# Altium PCB DIO_8SMA_8MCX.PcbDoc (part 8 of 9)
Units mm, origin at the board's own origin, x right, y up, seen from the top; angles counter-clockwise.
Board outline 222.9 x 100 mm, 6 copper layers (TopLayer, L2, L3, L4, L5, Bottom Layer), stack 1.492 mm thick; 542 components, 326 nets, 1968 pads, 1583 vias.
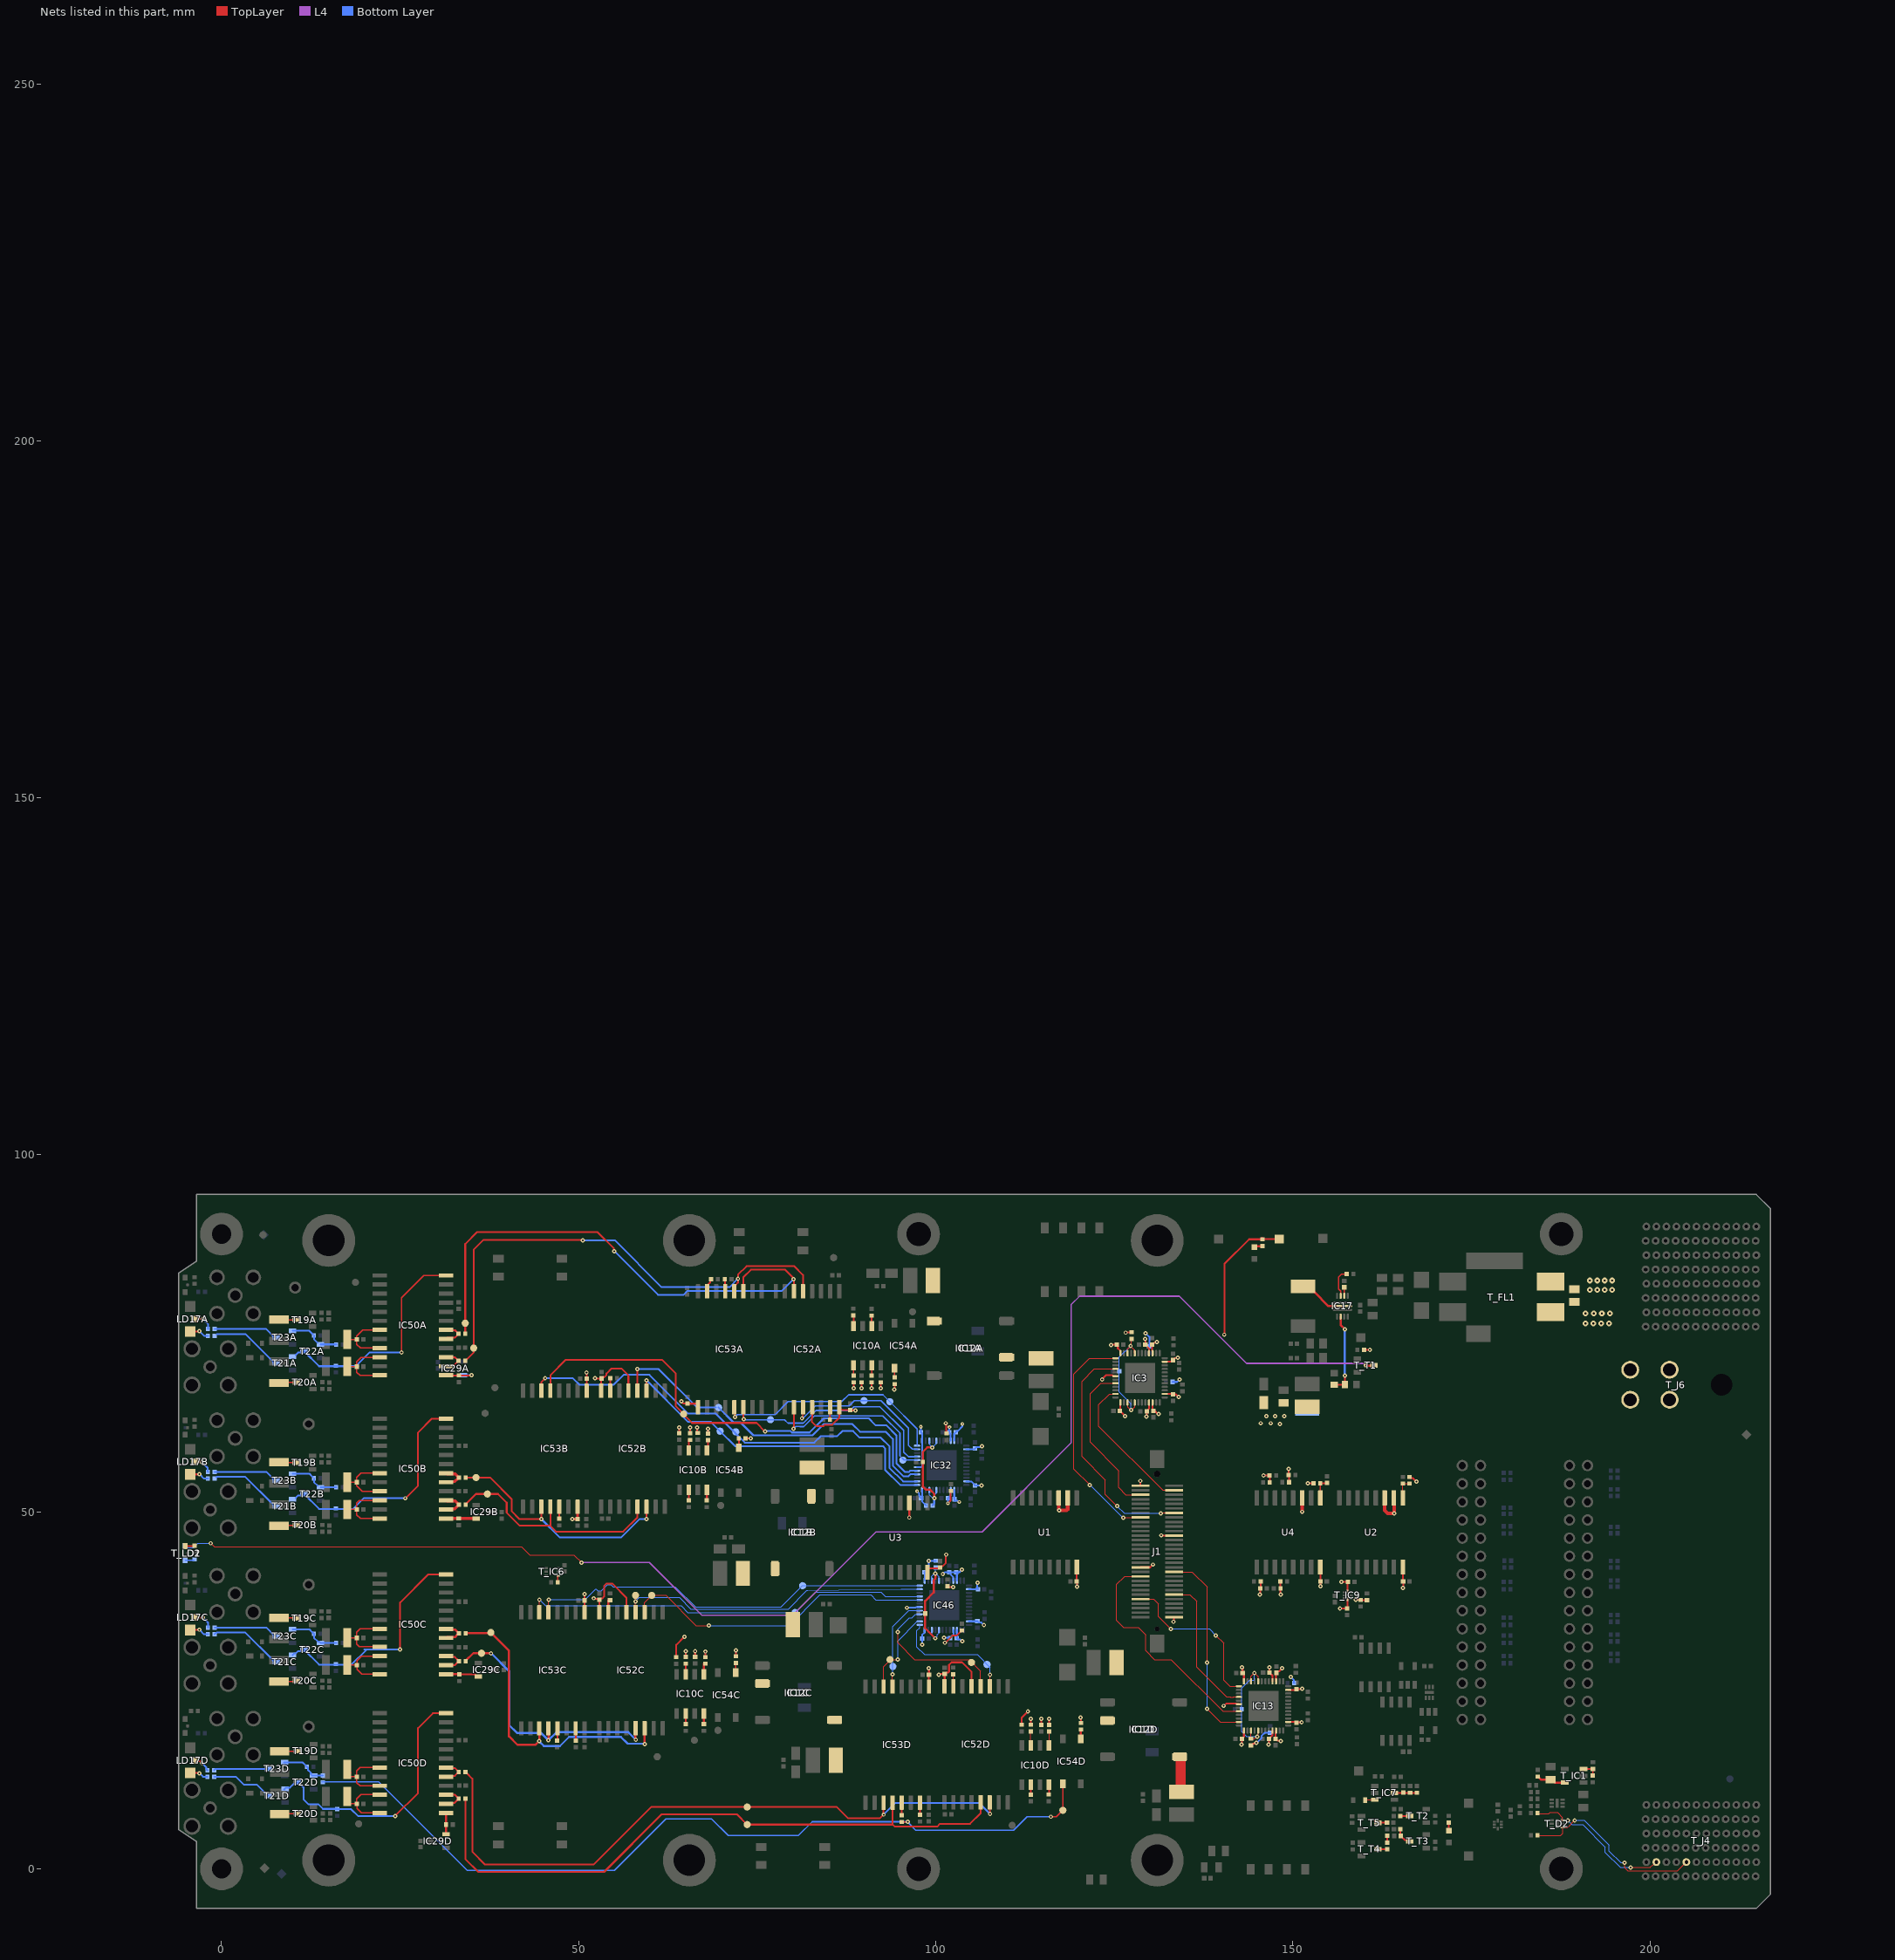
[diagram p11: the nets of this part, all layers, seen from the top]

## Via types
v1: diameter 0.6, hole 0.25, TopLayer to Bottom Layer, tented both sides, 1359 vias
v2: diameter 0.5, hole 0.2, TopLayer to Bottom Layer, tented both sides, 127 vias
v3: diameter 0.6, hole 0.3, TopLayer to Bottom Layer, tented both sides, 45 vias
v4: diameter 0.8, hole 0.3, TopLayer to Bottom Layer, tented both sides, 40 vias
v5: diameter 0.5, hole 0.25, TopLayer to Bottom Layer, tented both sides, 12 vias

## Nets (pads, with @x,y where several pads share a name; then routed paths per layer and width w, separated by ;. In a path a pad name is that pad's centre, name@x,y a point inside that pad or via, vN(x,y) a via of type N, cw(c..) or ccw(c..) an arc to the next point about the centre after c; other vN are vias at no path point) (continued)
LED_OUTD: B10D.1 IC54D.4 R216D.1 R222D.2 | length 120
  TopLayer w0.2: R216D.1@95.25,6.563 96.063,6.563 v1(96.1,6.6) ; v1(116.1,7.3) 116.9,7.3 B10D.1@117.8,8.2 ; B10D.1@117.78,8.2 IC54D.4@117.78,11.918
  Bottom Layer w0.2: R222D.2@14.046,12.2 22,12.2 34.4,-0.2 55,-0.2 62.2,7 68.6,7 70.946,4.654 80.754,4.654 82.7,6.6 v1(96.1,6.6) 96.1,6.492 97.192,5.4 110.909,5.4 ; 110.909,5.409 112.8,7.3 v1(116.1,7.3)
NetB4A_1: B4A.1 IC52A.5 IC53A.12 R204A.2 | length 71.9
  TopLayer w0.25: R204A.2@34.12,71.138 34.12,71.158 34.285,71.323 34.305,71.323 35.295,72.313 B4A.1@35.295,72.934 35.295,86.695 36.689,88.089 50.543,88.089 v1(50.594,88.039) ; IC53A.12@71.794,80.892 71.969,81.067 71.969,81.77 72.3,82.101 v1@72.3,82.5 ; v1(72.3,82.65) v1@72.3,82.5 ; IC52A.5@81.415,80.892 81.415,83.185 80.2,84.4 73.5,84.4 72.3,83.2 v1@72.3,82.5
  Bottom Layer w0.25: v1@50.603,88.039 55.061,88.039 61.629,81.471 71.121,81.471 v1(72.3,82.65)
NetB4B_1: B4B.1 IC52B.5 IC53B.12 R204B.2 | length 32.7
  TopLayer w0.25: R204B.2@34.17,51 34.335,51.165 34.335,51.224 35.611,52.5 B4B.1@37.218,52.5 38.7,52.5 39.924,51.276 39.924,49.876 41.715,48.085 46.033,48.085 ; IC53B.12@46.033,50.707 46.033,49.017 46.033,48.917 46.033,48.023 46.815,47.24 56.24,47.24 58.235,49.235 IC52B.5@58.235,50.708
NetB4C_1: B4C.1 IC52C.5 IC53C.12 R204C.2 | length 37.9
  TopLayer w0.3: R204C.2@34.17,29.1 34.17,29.12 35.25,30.2 B4C.1@36.4,30.2 37.693,30.2 v1(37.72,30.173) ; v1(45.757,18.006) 45.765,18.014 IC53C.12@45.765,19.675 ; IC52C.5@57.961,19.688 57.961,18.139 v1(58,18.1)
  Bottom Layer w0.3: v1(37.72,30.173) 37.777,30.173 40.272,27.677 40.272,20.128 41.355,19.045 44.719,19.045 v1(45.757,18.006) 46.886,19.134 56.966,19.134 v1(58,18.1)
NetB4D_1: B4D.1 IC52D.5 IC53D.12 R204D.2 | length 90.8
  TopLayer w0.25: R204D.2@34.155,9.834 34.155,1.345 34.229,1.271 35.927,-0.427 53.574,-0.427 61.63,7.629 72.171,7.629 B4D.1@73.6,6.2 93.965,6.2 ; IC53D.12@93.965,9.275 93.965,6.2 ; IC52D.5@106.285,9.308 106.285,7.785 104.8,6.3 100.6,6.3 100.2,5.9 94.265,5.9 93.965,6.2
NetB6A_1: B6A.1 IC52A.6 IC53A.11 R205A.2 | length 74.8
  TopLayer w0.25: R205A.2@34.12,74.938 B6A.1@34.12,76.416 34.12,87.52 35.8,89.2 52.6,89.2 54.933,86.867 54.933,86.567 v1(55,86.5) ; IC53A.11@73.06,81.396 73.06,82.837 74.123,83.9 78.918,83.9 79.932,82.886 79.932,82.863 80.1,82.695 v1(80.1,82.6) 80.145,82.555 IC52A.6@80.145,81.392
  Bottom Layer w0.25: v1(55,86.5) 61.1,80.4 63.752,80.4 63.771,80.381 64.222,80.381 64.241,80.4 64.7,80.4 65.245,80.945 78.445,80.945 v1(80.1,82.6)
NetB6B_1: B6B.1 IC52B.6 IC53B.11 R205B.2 | length 34.3
  TopLayer w0.25: R205B.2@34.17,54.8 B6B.1@35.632,54.8 37.6,54.8 40.6,51.8 40.6,50.1 41.713,48.987 v1(44.781,48.987) 44.763,49.005 IC53B.11@44.763,50.707 ; v1(59.497,48.968) IC52B.6@59.497,50.694
  Bottom Layer w0.25: v1(44.781,48.987) 47.368,46.4 55.943,46.4 58.512,48.968 v1(59.497,48.968)
NetB6C_1: B6C.1 IC52C.6 IC53C.11 R205C.2 | length 44
  TopLayer w0.3: R205C.2@34.261,33 37.8,33 40.238,30.562 40.238,18.562 41.447,17.353 43.915,17.353 44.495,17.933 IC53C.11@44.495,19.675 ; IC52C.6@59.231,19.688 59.231,17.95 59.237,17.944 v1(59.235,17.482) v1(59.235,17.482)
  Bottom Layer w0.3: v1(44.477,17.915) 44.477,17.856 45.133,17.2 47.373,17.2 48.653,18.48 55.915,18.48 56.865,17.53 59.188,17.53 v1(59.235,17.482)
NetB6D_1: B6D.1 IC52D.6 IC53D.11 R205D.2 | length 93.6
  TopLayer w0.25: R205D.2@34.152,13.583 34.152,13.563 34.317,13.398 34.337,13.398 35.1,12.636 35.1,2.4 36.9,0.6 52.091,0.6 60.143,8.653 B6D.1@73.6,8.653 86.147,8.653 87.7,7.1 92.2,7.1 v1(92.7,7.6) 92.688,7.612 IC53D.11@92.688,9.275 ; IC52D.6@107.555,9.308 107.555,7.745 v1(107.6,7.7)
  Bottom Layer w0.25: v1(92.7,7.6) 94.3,9.2 106.1,9.2 v1(107.6,7.7)
NetC1_1: C1.1 IC17.9 | length 1.2
  TopLayer w0.2: IC17.9@157.193,80.25 157.193,81.45 C1.1@157.196,81.454
NetIC1A_2: IC1A.2 IC12A.2 L11A.1
NetIC1A_5: IC1A.5 IC12A.5 L5A.2
NetIC1B_2: IC1B.2 IC12B.2 L11B.1
NetIC1B_5: IC1B.5 IC12B.5 L5B.2
NetIC1C_2: IC1C.2 IC12C.2 L11C.1
NetIC1C_5: IC1C.5 IC12C.5 L5C.2
NetIC1D_2: IC1D.2 IC12D.2 L11D.1
NetIC1D_5: IC1D.5 IC12D.5 L5D.2 | length 4.8
  TopLayer w1.4: IC1D.5@134.277,15.578 134.277,10.923 L5D.2@134.4,10.8
NetIC3_20: IC3.20 IC3.22 IC3.39 IC3.41 R5.1 R10.1 | length 16.4
  TopLayer w0.15: IC3.39@126.858,65.317 126.887,65.288 126.887,64.655 127.303,64.239 127.373,64.239 127.858,64.724 IC3.41@127.858,65.317 ; IC3.22@126.858,72.217 126.858,72.808 v1(127.273,73.222) ; R10.1@127.4,74.23 127.4,73.471 127.273,73.344 v1(127.273,73.222) ; IC3.20@127.858,72.217 127.83,72.245 127.83,72.67 127.278,73.222 v1(127.273,73.222)
  Bottom Layer w0.15: v1(127.273,73.222) 125.705,71.655 R5.1@125.705,69.669 125.707,69.667 125.707,66.793 127.352,65.148 v1(127.352,64.239)
NetIC10A_1: IC10A.1 R34A.1 | length 1.5
  TopLayer w0.2: IC10A.1@88.489,70.517 88.489,69.081 R34A.1@88.5,69.07
NetIC10A_3: IC10A.3 R29A.1 | length 1.5
  TopLayer w0.2: R29A.1@91,69.07 91.029,69.099 IC10A.3@91.029,70.517
NetIC10A_6: IC10A.6 R87A.2 | length 1.5
  TopLayer w0.25: R87A.2@91.017,77.477 91.029,77.465 IC10A.6@91.029,76.017
NetIC10A_8: IC10A.8 R88A.2 | length 1.5
  TopLayer w0.25: R88A.2@88.462,77.508 88.489,77.481 IC10A.8@88.489,76.017
NetIC10B_1: IC10B.1 R34B.1 | length 1.5
  TopLayer w0.25: IC10B.1@67.958,58.602 68.1,58.744 R34B.1@68.1,60.03
NetIC10B_3: IC10B.3 R29B.1 | length 1.5
  TopLayer w0.25: R29B.1@65.408,60.072 65.418,60.063 IC10B.3@65.418,58.602
NetIC10B_6: IC10B.6 R87B.2 | length 1.5
  TopLayer w0.25: IC10B.6@65.418,53.102 65.428,53.092 R87B.2@65.428,51.616
NetIC10B_8: IC10B.8 R88B.2 | length 1.5
  TopLayer w0.25: R88B.2@67.953,51.622 67.958,51.627 IC10B.8@67.958,53.102
NetIC10C_1: IC10C.1 R34C.1 | length 1.5
  TopLayer w0.25: R34C.1@67.526,28.743 67.531,28.738 IC10C.1@67.531,27.263
NetIC10C_3: IC10C.3 R29C.1 | length 1.5
  TopLayer w0.25: R29C.1@64.982,28.733 64.991,28.723 IC10C.3@64.991,27.263
NetIC10C_6: IC10C.6 R87C.2 | length 1.5
  TopLayer w0.25: IC10C.6@64.991,21.763 64.991,20.286 R87C.2@65.001,20.276
NetIC10C_8: IC10C.8 R88C.2 | length 1.5
  TopLayer w0.25: R88C.2@67.526,20.283 67.531,20.288 IC10C.8@67.531,21.763
NetIC10D_1: IC10D.1 R34D.1 | length 1.5
  TopLayer w0.15: IC10D.1@115.855,17.782 115.9,17.828 R34D.1@115.9,19.23
NetIC10D_3: IC10D.3 R29D.1 | length 1.5
  TopLayer w0.15: R29D.1@113.305,19.252 113.305,17.792 IC10D.3@113.315,17.782
NetIC10D_6: IC10D.6 R87D.2 | length 1.9
  TopLayer w0.25: R87D.2@113.315,10.396 IC10D.6@113.315,11.782 IC10D.6@113.315,12.282
NetIC10D_8: IC10D.8 R88D.2 | length 1.9
  TopLayer w0.25: R88D.2@115.855,10.406 IC10D.8@115.855,11.782 IC10D.8@115.855,12.282
NetIC13_20: IC13.20 IC13.22 IC13.39 IC13.41 R11.1 R26.1 | length 17.6
  TopLayer w0.15: IC13.39@144.146,19.365 144.146,18.238 R11.1@144.132,18.225 144.691,18.225 144.977,18.51 v1(145.004,18.51) 145.004,18.632 145.142,18.77 IC13.41@145.142,19.361 ; IC13.22@144.15,26.269 144.15,26.968 v1(144.619,27.437) 145.15,26.906 IC13.20@145.15,26.269
  Bottom Layer w0.15: v1(144.619,27.437) 144.619,26.533 144.531,26.445 143.945,26.445 142.844,25.345 142.844,23.322 142.85,23.317 R26.1@142.85,22.354 142.85,19.188 143.528,18.51 v1(145.004,18.51)
NetIC17_2: IC17.2 L10.1 | length 6.6
  TopLayer w0.3: L10.1@151.443,81.575 152.218,81.575 152.993,80.8 154.993,78.8 IC17.2@156.943,78.8
NetIC17_5: IC17.5 R51.1 R53.2 | length 11.3
  TopLayer w0.3: R51.1@155.8,67.8 157.261,67.8 R53.2@157.289,67.829 157.289,69.089 v1(157.3,69.1) ; IC17.5@156.693,77.35 156.693,76.176 157.273,75.596 v1(157.273,75.539)
  Bottom Layer w0.3: v1(157.273,75.539) 157.273,69.127 v1(157.3,69.1)
NetIC17_10: IC17.10 R68.1 | length 4.1
  TopLayer w0.2: IC17.10@156.693,80.25 156.693,80.9 156.397,81.196 156.397,82.887 156.81,83.3 R68.1@157.53,83.3
NetIC29A_2: IC29A.2 IC50A.13 R202A.2 | length 4.7
  TopLayer w0.25: IC50A.13@31.45,69.13 31.471,69.109 R202A.2@33.218,69.109 34.973,69.109 v1(34.99,69.125)
  Bottom Layer w0.25: IC29A.2@33.85,69.15 33.851,69.151 34.964,69.151 v1(34.99,69.125)
NetIC29B_2: IC29B.2 IC50B.13 R202B.2 | length 4.4
  TopLayer w0.4: IC50B.13@31.45,49.065 33.195,49.065 R202B.2@33.2,49.07 35.83,49.07 IC29B.2@35.85,49.05
NetIC29C_2: IC29C.2 IC50C.13 R202C.2 | length 4.6
  TopLayer w0.3: IC50C.13@31.45,27.265 33.275,27.265 R202C.2@33.3,27.24 35.435,27.24 IC29C.2@35.725,26.95 ; IC29C.2@36.025,26.95 IC29C.2@36.25,26.95
NetIC29D_2: IC29D.2 IC50D.13 R202D.2 | length 3
  TopLayer w0.3: IC50D.13@31.447,7.821 31.43,7.805 R202D.2@31.43,6.2 31.45,6.18 IC29D.2@31.45,4.85
NetIC32_20: IC32.20 IC32.22 IC32.39 IC32.41 R3.2 R61.1 | length 15.3
  TopLayer w0.3: v1(99.508,59.028) 99.488,59.008 98.808,59.008 98.192,58.392 R61.1@98.192,57.014 98.204,57.002 98.204,56.12 98.215,56.108 98.215,53.492 98.625,53.083 99.217,53.083 99.8,52.5 v1(99.8,51.9)
  Bottom Layer w0.15: IC32.22@99.093,53.058 99.093,52.387 99.493,51.986 99.714,51.986 v1(99.8,51.9) 99.8,52.022 99.888,52.11 99.888,52.426 100.064,52.602 100.064,53.03 IC32.20@100.093,53.058 ; IC32.39@99.093,59.958 99.101,59.95 99.101,59.436 v1(99.508,59.028) 100.018,59.538 100.018,59.543 100.093,59.618 IC32.41@100.093,59.958
  Bottom Layer w0.3: R3.2@99.57,50.9 99.57,50.92 99.8,51.15 v1(99.8,51.9)
NetIC32_25: B7B.1 IC32.25 IC52B.11 | length 47.2
  TopLayer w0.25: IC52B.11@59.502,66.956 IC52B.11@59.505,66.958 ; IC52B.11@59.507,66.96 v1@59.507,68.414
  Bottom Layer w0.25: v1(59.509,68.416) 65.339,62.586 68.514,62.586 B7B.1@69.8,61.3 71.9,59.2 92.6,59.2 92.9,58.9 92.9,55.894 95.036,53.758 IC32.25@97.393,53.758
NetIC32_26: B9B.1 IC32.26 IC53B.6 | length 64.3
  TopLayer w0.25: IC53B.6@44.763,66.957 44.785,66.979 44.785,68.185 v1(45.3,68.7)
  Bottom Layer w0.25: v1(45.3,68.7) 49.2,68.7 50.1,67.8 54.9,67.8 56.298,69.198 59.903,69.198 65.356,63.745 69.209,63.745 71.508,61.446 71.551,61.446 71.877,61.12 71.877,61.077 73.254,59.7 83,59.7 83.869,60.569 86.18,60.569 86.922,61.311 88.424,61.311 89.335,60.4 92.3,60.4 93.5,59.2 93.5,56.185 95.427,54.258 IC32.26@97.393,54.258
NetIC32_28: B5B.1 IC32.28 IC52B.12 | length 51.6
  TopLayer w0.25: IC52B.12@58.235,66.958 v1(58.235,70)
  Bottom Layer w0.25: v1(58.235,70) 61.2,70 66.6,64.6 B5B.1@69.207,64.6 ; B5B.1@69.6,64.6 71.655,62.545 72.626,62.545 74.461,60.71 82.75,60.71 84.34,62.3 88.3,62.3 89.39,61.21 91.79,61.21 91.8,61.2 93,61.2 93.984,60.216 93.984,56.471 95.467,54.988 96.188,54.988 96.458,55.258 IC32.28@97.393,55.258
NetIC32_29: B8B.1 IC32.29 IC53B.5 | length 67.7
  TopLayer w0.25: IC53B.5@46.033,66.957 46.033,69.133 48.2,71.3 61.677,71.3 63.6,69.377 63.6,64.8 B8B.1@64.7,63.7 64.7,63.637 65.882,62.455 74.9,62.455 v1(76.1,61.255)
  Bottom Layer w0.25: v1(76.1,61.255) 76.15,61.305 79.672,61.305 79.867,61.11 82.318,61.11 84.308,63.1 90.6,63.1 91.56,62.14 93.06,62.14 94.494,60.706 94.494,56.787 95.717,55.563 96.234,55.563 96.437,55.766 IC32.29@97.385,55.766
NetIC32_32: B7A.1 IC32.32 IC52A.11 | length 26
  TopLayer w0.2: v1(80.093,61.655) 80.145,61.707 IC52A.11@80.145,65.142
  Bottom Layer w0.2: v1(80.093,61.655) 80.113,61.655 80.41,61.952 80.998,61.952 81.007,61.943 81.51,61.943 83.011,63.445 92.587,63.445 94.984,61.049 94.984,57.846 95.571,57.258 IC32.32@97.393,57.258
NetIC32_33: B9A.1 IC32.33 IC53A.6 | length 32.3
  TopLayer w0.2: IC53A.6@73.064,65.142 73.064,63.036 v1(73.1,63)
  Bottom Layer w0.2: v1(73.1,63) 73.208,63 73.308,62.9 B9A.1@76.858,62.9 78.828,62.9 79.299,62.429 81.45,62.429 83.223,64.202 88.008,64.202 88.532,64.727 92.173,64.727 95.5,61.4 95.5,58.381 96.166,57.716 96.979,57.716 97.003,57.739 97.373,57.739 IC32.33@97.393,57.758
NetIC32_35: B5A.1 IC32.35 IC52A.12 | length 23.5
  TopLayer w0.2: v1(81.271,63.084) 81.271,63.192 81.408,63.329 81.408,65.134 IC52A.12@81.415,65.142
  Bottom Layer w0.2: v1(81.271,63.084) 81.377,63.084 83.134,64.841 87.856,64.841 88.587,65.572 92.328,65.572 96.185,61.715 96.185,59.315 96.716,58.784 96.997,58.784 97.003,58.778 97.373,58.778 IC32.35@97.393,58.758
NetIC32_36: B8A.1 IC32.36 IC53A.5 | length 33
  TopLayer w0.2: IC53A.5@71.794,65.142 71.847,65.089 71.847,63.353 v1(71.9,63.3)
  Bottom Layer w0.2: v1(71.9,63.3) 72.22,63.62 77.52,63.62 79.331,65.431 86.831,65.431 87.8,66.4 92.6,66.4 B8A.1@93.571,65.429 97.391,61.609 97.391,60.766 97.393,60.765 IC32.36@97.393,59.258
NetIC46_20: IC46.20 IC46.22 IC46.39 IC46.41 R9.2 R103.1 | length 16.4
  TopLayer w0.3: v1(99.923,32.285) 98.516,33.692 R103.1@98.516,35.761 98.516,37.522 99.716,38.722 99.716,40.414 99.948,40.646 v1(99.948,41.361)
  Bottom Layer w0.15: IC46.22@99.459,33.461 99.459,32.749 v1(99.923,32.285) 99.923,32.288 100.231,32.595 100.231,32.827 100.431,33.027 100.431,33.433 IC46.20@100.459,33.461 ; IC46.39@99.459,40.361 99.442,40.379 99.442,40.951 99.852,41.361 v1(99.948,41.361) ; R9.2@99.98,42.203 99.948,42.172 v1(99.948,41.361) ; IC46.41@100.459,40.361 100.459,40.918 100.016,41.361 v1(99.948,41.361)
NetIC46_25: B7D.1 IC46.25 IC52D.11 | length 17.4
  TopLayer w0.15: IC52D.11@107.555,25.558 107.6,25.604 v1(107.6,27.2)
  Bottom Layer w0.15: IC46.25@97.759,34.161 97.759,33.772 97.346,33.359 97.346,31.054 98.408,29.992 105.808,29.992 107.6,28.2 v1(107.6,27.2)
NetIC46_26: B9D.1 IC46.26 IC53D.6 | length 12
  TopLayer w0.15: IC53D.6@92.695,25.525 92.695,28.295 93.7,29.3 v1(94.7,29.3)
  Bottom Layer w0.15: v1(94.7,29.3) 94.7,31.937 97.425,34.661 IC46.26@97.759,34.661
NetIC46_28: B5D.1 IC46.28 IC52D.12 | length 21.2
  TopLayer w0.15: v1(94.69,33.146) 94.69,31.647 97.038,29.3 104.7,29.3 106.285,27.715 IC52D.12@106.285,25.558
  Bottom Layer w0.15: v1(94.69,33.146) 94.69,33.59 96.271,35.171 96.651,35.171 97.142,35.661 IC46.28@97.759,35.661
NetIC46_29: B8D.1 IC46.29 IC53D.5 | length 13.2
  TopLayer w0.15: v1(93.924,27.224) 93.9,27.2 93.9,25.59 IC53D.5@93.965,25.525
  Bottom Layer w0.15: v1(93.924,27.224) 94,27.3 94,33.919 96.241,36.161 96.954,36.161 ; 96.955,36.161 IC46.29@97.759,36.161
NetIC46_32: B7C.1 IC46.32 IC52C.11 | length 44.1
  TopLayer w0.15: IC52C.11@59.231,35.938 59.231,37.3 B7C.1@60.231,38.3 62.2,38.3 66.423,34.077 v1(68.21,34.077)
  Bottom Layer w0.15: v1(68.21,34.077) 79.477,34.077 83.768,38.368 90.896,38.368 91.603,37.661 IC46.32@97.759,37.661
NetIC46_33: B9C.1 IC46.33 IC53C.6 | length 57.2
  TopLayer w0.12: IC53C.6@44.495,35.925 44.495,37.695 v1(44.5,37.7)
  Bottom Layer w0.12: v1(44.5,37.7) 45.335,36.865 64.335,36.865 65.3,35.9 B9C.1@80.3,35.9 83.147,38.747 92.353,38.747 92.939,38.161 IC46.33@97.759,38.161
NetIC46_35: B5C.1 IC46.35 IC52C.12 | length 44.1
  TopLayer w0.15: IC52C.12@57.961,35.938 57.961,37.561 B5C.1@57.961,38.3
  Bottom Layer w0.15: v1(57.961,37.461) 58.501,38.001 64.099,38.001 65.696,36.404 79.404,36.404 81.975,38.975 82.018,39.018 82.079,39.019 95.113,39.161 IC46.35@97.759,39.161
NetIC46_36: B8C.1 IC46.36 IC53C.5 | length 57.4
  TopLayer w0.12: IC53C.5@45.765,35.925 45.765,37.665 v1(45.8,37.7)
  Bottom Layer w0.12: v1(45.8,37.7) 50.9,37.7 52.361,39.161 52.46,39.161 52.701,38.92 53.183,38.92 54.051,39.788 54.532,39.788 54.82,39.5 63.521,39.5 66.363,36.659 78.359,36.659 B8C.1@81.361,39.661 IC46.36@97.759,39.661
NetIC50A_7: IC50A.7 IC50A.9 R203A.2 R206A.2 | length 9.5
  TopLayer w0.175: R203A.2@17.6,74.15 17.605,74.145 R206A.2@18.93,74.145 ; IC50A.9@22.15,72.94 19.46,72.94 18.93,73.47 R206A.2@18.93,74.145 ; IC50A.7@22.15,75.48 19.78,75.48 18.93,74.63 R206A.2@18.93,74.145
NetIC50A_10: IC50A.10 IC50A.12 R208A.2 R210A.2 | length 9.7
  TopLayer w0.175: R208A.2@17.6,70.35 R210A.2@18.915,70.35 ; IC50A.12@22.15,69.13 22.12,69.1 19.4,69.1 18.93,69.57 R210A.2@18.93,70.335 ; IC50A.10@22.15,71.67 22.08,71.6 19.5,71.6 18.93,71.03 R210A.2@18.93,70.35 ; R210A.2@18.915,70.35 R210A.2@18.93,70.35 ; R210A.2@18.915,70.35 R210A.2@18.93,70.335 ; R210A.2@18.93,70.335 R210A.2@18.93,70.35
NetIC50A_14: IC50A.14 IC50A.15 R204A.1 | length 4
  TopLayer w0.25: IC50A.14@31.45,70.4 31.625,70.575 32.597,70.575 32.975,70.953 33.015,70.953 33.18,71.118 33.18,71.158 33.015,71.323 32.995,71.323 32.679,71.64 31.48,71.64 IC50A.15@31.45,71.67
NetIC50A_17: IC50A.17 IC50A.18 R205A.1 | length 4
  TopLayer w0.25: IC50A.17@31.45,74.21 31.614,74.374 32.616,74.374 32.995,74.753 33.015,74.753 33.18,74.918 R205A.1@33.18,74.938 33.18,74.958 33.015,75.123 32.995,75.123 32.679,75.44 31.49,75.44 IC50A.18@31.45,75.48
NetIC50A_24: IC50A.24 R220A.1 T21A.1 T22A.3 | length 32
  TopLayer w0.2: v1(25.2,72.3) 25.2,80 28.3,83.1 IC50A.24@31.45,83.1
  Bottom Layer w0.25: T21A.1@10.363,71.95 10.717,72.304 T22A.3@11.354,72.304 ; T22A.3@11.55,72.5 13.65,70.4 19.1,70.4 ; 18.8,70.4 20.7,72.3 v1(25.2,72.3)
NetIC50B_7: IC50B.7 IC50B.9 R203B.2 R206B.2 | length 9.6
  TopLayer w0.175: R203B.2@17.605,54.145 18.859,54.145 R206B.2@18.93,54.145 ; IC50B.9@22.15,52.875 19.69,52.875 18.891,53.675 18.891,54.106 R206B.2@18.93,54.145 ; IC50B.7@22.15,55.415 19.515,55.415 18.909,54.809 18.909,54.166 R206B.2@18.93,54.145
NetIC50B_10: IC50B.10 IC50B.12 R208B.2 R210B.2 | length 9.8
  TopLayer w0.175: R208B.2@17.6,50.35 18.915,50.35 R210B.2@18.926,50.339 ; R210B.2@18.926,50.331 18.926,49.57 19.43,49.065 IC50B.12@22.15,49.065 ; R210B.2@18.93,50.335 R210B.2@18.926,50.339 ; IC50B.10@22.15,51.605 19.301,51.605 18.926,51.23 R210B.2@18.926,50.339
NetIC50B_14: IC50B.14 IC50B.15 R204B.1 | length 4.1
  TopLayer w0.4: IC50B.14@31.45,50.335 31.55,50.435 32.665,50.435 33.12,50.89 33.14,50.89 33.23,50.98 R204B.1@33.23,51 33.23,51.02 33.14,51.11 33.12,51.11 32.712,51.518 31.537,51.518 IC50B.15@31.45,51.605
NetIC50B_17: IC50B.17 IC50B.18 R205B.1 | length 4.1
  TopLayer w0.4: IC50B.17@31.45,54.145 31.55,54.245 32.675,54.245 33.12,54.69 33.14,54.69 33.23,54.78 R205B.1@33.23,54.8 33.23,54.82 33.14,54.91 33.12,54.91 32.707,55.323 31.542,55.323 IC50B.18@31.45,55.415
NetIC50B_24: IC50B.24 R220B.1 T21B.1 T22B.3 | length 31.5
  TopLayer w0.25: v1(25.74,51.892) 25.753,51.892 27.5,53.639 27.5,61.1 29.435,63.035 IC50B.24@31.45,63.035
  Bottom Layer w0.25: T21B.1@10.363,51.95 10.717,52.304 T22B.3@11.354,52.304 ; T22B.3@11.55,52.5 13.65,50.4 16,50.4 18.4,50.4 19.892,51.892 v1(25.74,51.892)
NetIC50C_7: IC50C.7 IC50C.9 R203C.2 R206C.2 | length 9.8
  TopLayer w0.175: R203C.2@17.605,32.345 R206C.2@18.93,32.345 ; IC50C.9@22.15,31.075 22.125,31.1 19.3,31.1 18.93,31.47 R206C.2@18.93,32.345 ; IC50C.7@22.15,33.615 19.415,33.615 18.93,33.13 R206C.2@18.93,32.345
NetIC50C_10: IC50C.10 IC50C.12 R208C.2 R210C.2 | length 9.5
  TopLayer w0.175: R208C.2@17.6,28.55 R210C.2@18.945,28.55 ; R210C.2@18.949,28.55 R210C.2@18.945,28.55 ; IC50C.12@22.15,27.265 19.635,27.265 18.969,27.931 18.969,28.496 R210C.2@18.93,28.535 R210C.2@18.945,28.55 ; IC50C.10@22.15,29.805 19.593,29.805 18.948,29.16 18.948,28.553 R210C.2@18.945,28.55
NetIC50C_14: IC50C.14 IC50C.15 R204C.1 | length 4.1
  TopLayer w0.25: IC50C.14@31.45,28.535 31.463,28.549 32.679,28.549 33.045,28.915 33.065,28.915 33.23,29.08 R204C.1@33.23,29.1 33.23,29.12 33.065,29.285 33.045,29.285 32.652,29.678 31.578,29.678 IC50C.15@31.45,29.805
NetIC50C_17: IC50C.17 IC50C.18 R205C.1 | length 4.1
  TopLayer w0.3: IC50C.17@31.45,32.345 31.555,32.451 32.681,32.451 33.07,32.84 33.09,32.84 33.23,32.98 R205C.1@33.23,33 33.23,33.02 33.09,33.16 33.07,33.16 32.7,33.53 31.536,33.53 IC50C.18@31.45,33.615
NetIC50C_24: IC50C.24 R220C.1 T21C.1 T22C.3 | length 32.1
  TopLayer w0.25: v1(25,30.7) 25,37.3 28.935,41.235 IC50C.24@31.45,41.235
  Bottom Layer w0.25: T21C.1@9.95,29.95 10.15,30.15 10.363,30.15 10.717,30.504 11.354,30.504 T22C.3@11.55,30.7 13.65,28.6 16,28.6 18.2,28.6 20.3,30.7 ; 20,30.7 v1(25,30.7)
NetIC50D_7: IC50D.7 IC50D.9 R203D.2 R206D.2 | length 10.1
  TopLayer w0.175: R203D.2@17.6,13.95 17.6,13.887 R203D.2@18.087,13.4 ; R203D.2@18.087,12.9 R206D.2@18.93,12.9 ; IC50D.9@22.147,11.631 19.369,11.631 18.93,12.07 18.93,12.893 R206D.2@18.93,12.9 ; IC50D.7@22.147,14.171 19.371,14.171 18.93,13.73 R206D.2@18.93,12.9
NetIC50D_10: IC50D.10 IC50D.12 R208D.2 R210D.2 | length 9.7
  TopLayer w0.175: R208D.2@17.6,10.133 R208D.2@18.083,9.65 ; R208D.2@18.083,9.15 18.879,9.15 R210D.2@18.93,9.099 ; R210D.2@18.93,9.15 18.93,9.79 19.546,10.405 IC50D.10@22.15,10.405 ; R210D.2@18.961,9.099 18.961,8.48 19.575,7.865 IC50D.12@22.15,7.865
NetIC50D_14: IC50D.14 IC50D.15 R204D.1 | length 4.1
  TopLayer w0.25: IC50D.14@31.447,9.091 31.599,9.244 32.625,9.244 33.03,9.649 33.05,9.649 33.215,9.814 R204D.1@33.215,9.834 33.215,9.854 33.05,10.019 33.03,10.019 32.688,10.361 IC50D.15@31.447,10.361
NetIC50D_17: IC50D.17 IC50D.18 R205D.1 | length 4.1
  TopLayer w0.25: IC50D.17@31.447,12.901 31.57,13.025 32.654,13.025 33.027,13.398 33.047,13.398 33.212,13.563 R205D.1@33.212,13.583 33.212,13.603 33.047,13.768 33.027,13.768 32.675,14.12 31.498,14.12 IC50D.18@31.447,14.171
NetIC50D_24: IC50D.24 R220D.1 T21D.1 T22D.3 | length 37.4
  TopLayer w0.25: v1(24.3,7.4) 27.5,10.6 27.5,19.7 29.591,21.791 IC50D.24@31.447,21.791
  Bottom Layer w0.25: T21D.1@8.738,11.1 9.019,11.381 9.581,11.381 10.11,11.91 10.385,11.91 T22D.3@10.589,12.114 ; T22D.3@10.592,12.11 10.792,12.11 10.992,11.91 10.992,11.89 11.475,11.407 11.475,9.723 12.136,9.062 13.538,9.062 14.2,8.4 R220D.1@16.2,8.4 ; R220D.1@16.2,8.37 18.13,8.37 19.1,7.4 v1(24.3,7.4)
NetIC52A_15: IC52A.15 R209A.1 | length 1.9
  TopLayer w0.2: R209A.1@85.177,62.8 85.177,64.594 IC52A.15@85.225,64.642
NetIC52B_15: IC52B.15 R209B.1 | length 1.7
  TopLayer w0.25: R209B.1@54.408,68.657 54.425,68.64 IC52B.15@54.425,66.958
NetIC52C_15: IC52C.15 R209C.1 | length 1.7
  TopLayer w0.25: R209C.1@54.135,37.637 54.151,37.621 IC52C.15@54.151,35.938
NetIC52D_15: IC52D.15 R209D.1 | length 1.7
  TopLayer w0.15: R209D.1@102.458,27.257 102.458,25.574 IC52D.15@102.475,25.558
NetIC53A_13: IC53A.13 R216A.2 | length 1.2
  TopLayer w0.25: R216A.2@70.47,82.607 70.47,81.446 IC53A.13@70.524,81.392
NetIC53A_15: IC53A.15 R214A.2 | length 1.4
  TopLayer w0.25: IC53A.15@67.984,81.392 68.159,81.567 68.159,81.859 68.4,82.1 68.4,82.47 R214A.2@68.53,82.6
NetIC53B_13: IC53B.13 R216B.2 | length 1.7
  TopLayer w0.25: IC53B.13@47.303,50.707 R216B.2@47.304,49.04 R216B.2@47.304,49.04
NetIC53B_15: IC53B.15 R214B.2 | length 2.5
  TopLayer w0.4: v1(49.1,49) R214B.2@49.867,49.001 ; IC53B.15@49.843,50.707 49.843,49.027 R214B.2@49.868,49.002
NetIC53C_13: IC53C.13 R216C.2 | length 1.7
  TopLayer w0.25: R216C.2@47,17.97 47.035,18.005 IC53C.13@47.035,19.675
NetIC53C_15: IC53C.15 R214C.2 | length 1.7
  TopLayer w0.25: IC53C.15@49.575,19.675 49.6,19.65 R214C.2@49.6,17.97
NetIC53D_13: IC53D.13 R216D.2 | length 1.8
  TopLayer w0.25: IC53D.13@95.235,9.275 95.235,7.517 R216D.2@95.25,7.503
NetIC53D_15: IC53D.15 R214D.2 | length 1.7
  TopLayer w0.25: IC53D.15@97.775,9.275 97.775,7.595 R214D.2@97.8,7.57
NetIC54A_1: IC54A.1 R221A.1 | length 1.3
  TopLayer w0.2: IC54A.1@94.211,70.127 94.211,68.849 R221A.1@94.235,68.825
NetIC54B_1: IC54B.1 R221B.1 | length 1.3
  TopLayer w0.25: R221B.1@72.43,60.3 72.43,58.989 IC54B.1@72.439,58.98
NetIC54C_1: IC54C.1 R221C.1 | length 1.3
  TopLayer w0.2: R221C.1@72,28.83 72,27.489 IC54C.1@72.002,27.487
NetIC54D_1: IC54D.1 R221D.1 | length 1.3
  TopLayer w0.3: IC54D.1@120.32,18.218 120.333,18.231 R221D.1@120.333,19.501
NetLD17A_2: LD17A.2 R217A.2 | length 2.8
  TopLayer w0.25: LD17A.2@-3.75,77 v1(-2.6,77)
  Bottom Layer w0.25: v1(-2.6,77) -1.909,76.309 R217A.2@-1.909,75.595
NetLD17A_3: LD17A.3 R215A.2 | length 2.8
  TopLayer w0.25: LD17A.3@-4.4,75.25 -3.15,75.25 v1(-3.1,75.3)
  Bottom Layer w0.25: v1(-3.1,75.3) -2.454,74.654 R215A.2@-1.909,74.654
NetLD17B_2: LD17B.2 R217B.2 | length 2.7
  TopLayer w0.25: LD17B.2@-3.75,57 v1(-2.8,57)
  Bottom Layer w0.25: v1(-2.8,57) -1.934,56.134 -1.934,55.621 R217B.2@-1.909,55.595
NetLD17B_3: LD17B.3 R215B.2 | length 2.8
  TopLayer w0.25: LD17B.3@-4.4,55.25 -3.15,55.25 v1(-3.1,55.3)
  Bottom Layer w0.25: v1(-3.1,55.3) -2.454,54.654 R215B.2@-1.909,54.654
NetLD17C_2: LD17C.2 R217C.2 | length 2.8
  TopLayer w0.25: LD17C.2@-3.75,35.2 v1(-2.6,35.2)
  Bottom Layer w0.25: v1(-2.6,35.2) -1.909,34.509 R217C.2@-1.909,33.795
NetLD17C_3: LD17C.3 R215C.2 | length 2.8
  TopLayer w0.25: LD17C.3@-4.4,33.45 -3.15,33.45 v1(-3.1,33.5)
  Bottom Layer w0.25: v1(-3.1,33.5) -2.454,32.854 R215C.2@-1.909,32.854
NetLD17D_2: LD17D.2 R217D.2 | length 2.5
  TopLayer w0.25: LD17D.2@-3.75,15.2 -3.65,15.1 -3.056,15.1 -2.767,14.812 v1(-2.734,14.812)
  Bottom Layer w0.25: v1(-2.734,14.812) -2.135,14.212 -2.135,13.965 R217D.2@-1.97,13.8
NetLD17D_3: LD17D.3 R215D.2 | length 2.7
  TopLayer w0.25: LD17D.3@-4.4,13.45 -3.15,13.45 v1(-3.1,13.4)
  Bottom Layer w0.25: v1(-3.1,13.4) -2.6,12.9 R215D.2@-1.97,12.9
NetR55_2: R55.2 R56.2 U2.1 | length 2.9
  TopLayer w0.15: U2.1@165.413,51.95 165.413,53.946 R56.2@165.424,53.957 166.341,53.957 R55.2@166.344,53.954
NetR85_2: R85.2 R86.2 U4.1 | length 3
  TopLayer w0.2: R85.2@153.839,53.992 154.598,53.992 154.715,54.109 R86.2@154.715,54.115 ; U4.1@153.845,51.95 R85.2@153.845,53.992 ; R86.2@154.808,54.045 R86.2@154.845,54.008
NetR207A_1: R207A.1 T19A.3 | length 2.4
  TopLayer w0.175: R207A.1@8.033,76.95 8.084,76.9 T19A.3@10.45,76.9
NetR207B_1: R207B.1 T19B.3 | length 2.4
  TopLayer w0.175: R207B.1@8.033,56.95 8.083,56.9 T19B.3@10.45,56.9
NetR207C_1: R207C.1 T19C.3 | length 2.4
  TopLayer w0.175: R207C.1@8.033,35.15 10.4,35.15 T19C.3@10.45,35.1
NetR207D_1: R207D.1 T19D.3 | length 2.5
  TopLayer w0.175: R207D.1@8.133,16.45 10.6,16.45 T19D.3@10.65,16.5
NetR211A_1: R211A.1 T20A.3 | length 2.5
  TopLayer w0.175: R211A.1@8.033,68.05 8.138,68.156 T20A.3@10.478,68.156
NetR211B_1: R211B.1 T20B.3 | length 2.5
  TopLayer w0.175: R211B.1@8.033,48.05 8.096,48.114 10.446,48.114 T20B.3@10.483,48.15
NetR211C_1: R211C.1 T20C.3 | length 2.5
  TopLayer w0.175: R211C.1@8.033,26.25 10.383,26.25 T20C.3@10.483,26.35
NetR211D_1: R211D.1 T20D.3 | length 2.5
  TopLayer w0.175: R211D.1@8.133,7.65 8.233,7.75 T20D.3@10.583,7.75
NetR215A_1: R215A.1 T21A.3 | length 9.6
  Bottom Layer w0.25: R215A.1@-0.719,74.839 -0.657,74.9 3.32,74.9 T21A.3@7.22,71
NetR215B_1: R215B.1 T21B.3 | length 9.6
  Bottom Layer w0.25: R215B.1@-0.719,54.839 -0.657,54.9 3.32,54.9 T21B.3@7.22,51
NetR215C_1: R215C.1 T21C.3 | length 10.4
  Bottom Layer w0.25: R215C.1@-0.969,32.854 -0.969,32.874 -0.804,33.039 -0.719,33.039 -0.657,33.1 3.32,33.1 7.22,29.2 7.45,29.2 T21C.3@7.65,29
NetR215D_1: R215D.1 T21D.3 | length 8.8
  Bottom Layer w0.25: R215D.1@-1.03,12.9 2,12.9 3.1,11.8 4.9,11.8 6.183,10.517 6.183,10.45 6.383,10.25 T21D.3@6.583,10.25
NetR217A_1: R217A.1 T23A.3 | length 8.9
  Bottom Layer w0.25: R217A.1@-0.969,75.595 6.255,75.595 T23A.3@7.45,74.4
NetR217B_1: R217B.1 T23B.3 | length 8.9
  Bottom Layer w0.25: R217B.1@-0.969,55.595 6.255,55.595 T23B.3@7.45,54.4
NetR217C_1: R217C.1 T23C.3 | length 9.1
  Bottom Layer w0.25: R217C.1@-0.969,33.795 6.255,33.795 7.45,32.6 T23C.3@7.65,32.6
NetR217D_1: R217D.1 T23D.3 | length 7.7
  Bottom Layer w0.25: R217D.1@-1.03,13.8 -1.03,13.82 -0.865,13.985 -0.734,13.985 -0.719,14 T23D.3@6.55,14
NetR222A_1: R222A.1 R223A.2 T22A.1 T23A.1 | length 6.4
  Bottom Layer w0.25: T23A.1@9.95,75.35 12.28,75.35 R223A.2@12.745,74.885 ; R223A.2@12.939,74.691 12.939,74.161 T22A.1@13.45,73.65 ; T22A.1@13.85,73.45 R222A.1@16.037,73.45
NetR222B_1: R222B.1 R223B.2 T22B.1 T23B.1 | length 6.4
  Bottom Layer w0.25: T23B.1@9.95,55.35 12.28,55.35 R223B.2@12.745,54.885 ; R223B.2@12.939,54.691 12.939,54.161 T22B.1@13.45,53.65 ; T22B.1@13.85,53.45 R222B.1@16.037,53.45
NetR222C_1: R222C.1 R223C.2 T22C.1 T23C.1 | length 7.2
  Bottom Layer w0.25: T23C.1@9.95,33.55 12.28,33.55 12.745,33.085 12.765,33.085 12.93,32.92 R223C.2@12.93,32.9 12.939,32.891 12.939,32.361 13.45,31.85 13.65,31.85 T22C.1@13.85,31.65 R222C.1@16.037,31.65
NetR222D_1: R222D.1 R223D.2 T22D.1 T23D.1 | length 6.5
  Bottom Layer w0.25: T23D.1@8.719,14.9 11.33,14.9 11.745,14.485 11.765,14.485 11.93,14.32 R223D.2@11.93,14.3 12.095,14.135 12.095,13.857 12.492,13.46 12.492,13.26 12.692,13.06 T22D.1@12.892,13.06 R222D.1@14.19,13.06
NetT_C2_2: T_C2.2 T_IC1.5 T_R2.1 | length 4.2
  TopLayer w0.3: T_R2.1@184.3,12.93 184.32,12.93 184.46,12.79 184.46,12.77 184.73,12.5 T_C2.2@186.1,12.5 186.275,12.5 186.693,12.082 T_IC1.5@188.098,12.082
NetT_C11_1: T_C11.1 T_FL1.3 T_J6.1 T_J6.2
  other v4: 191.6,81.1 192.633,81.1 193.667,81.1 194.7,81.1 191.6,82.4 192.633,82.4 193.667,82.4 194.7,82.4
NetT_C11_2: T_C11.2 T_FL1.1 T_J6.3 T_J6.4
  other v4: 191,76.4 192.1,76.4 193.2,76.4 194.3,76.4 191,77.8 192.133,77.8 193.267,77.8 194.4,77.8
NetT_C13_1: T_C13.1 T_IC7.5 T_R29.2 T_R30.2 | length 3.2
  TopLayer w0.25: T_IC7.5@164.2,10.633 167.327,10.633 T_R29.2@167.357,10.662
NetT_C14_1: T_C14.1 T_C21.2 | length 1
  TopLayer w0.25: T_C21.2@163.2,3.65 T_C14.1@163.2,4.65
NetT_C15_1: T_C15.1 T_T5.3 | length 1.3
  TopLayer w0.25: T_T5.3@161.918,6.45 163.154,6.45 T_C15.1@163.184,6.48
NetT_C17_1: T_C17.1 T_T2.3 | length 1.3
  TopLayer w0.25: T_C17.1@165.05,7.4 166.34,7.4 T_T2.3@166.368,7.428
NetT_C18_1: T_C18.1 T_C19.1 T_T3.3 | length 2.5
  TopLayer w0.25: T_C19.1@165.072,4.507 T_C18.1@165.072,5.425 ; T_C19.1@165.09,4.613 165.677,4.026 166.207,4.026 T_T3.3@166.382,3.85
NetT_C21_1: T_C21.1 T_T4.3 | length 1.3
  TopLayer w0.25: T_T4.3@161.918,2.75 T_C21.1@163.2,2.75
NetT_D2_4: T_D2.4 T_J4.H2 T_R15.2 | length 26.6
  TopLayer w0.15: T_R15.2@184.27,4.7 187.5,4.7 187.8,5 187.8,5.76 T_D2.4@187.76,5.8 188.456,5.8 v1(189.456,6.8) ; v1(196.451,0.863) 196.451,0.151 196.896,-0.295 203.855,-0.295 T_J4.H2@205.1,0.95 T_J4.H2@205.103,0.95
  Bottom Layer w0.15: v1(189.456,6.8) 190.8,6.8 194.3,3.3 194.3,2.5 195.937,0.863 v1(196.451,0.863)
NetT_D2_6: T_D2.6 T_J4.K2 T_R17.2 | length 20.8
  TopLayer w0.12: T_R17.2@184.27,7.8 184.352,7.718 185.839,7.718 186.001,7.88 187.04,7.88 187.76,7.16 T_D2.6@187.76,6.8 v1(188.5,6.8) ; v1(197.3,0.2) 197.32,0.22 200.026,0.22 200.07,0.22 200.103,0.248 200.716,0.762 200.902,0.948 T_J4.K2@200.903,0.95
  Bottom Layer w0.12: v1(188.5,6.8) 189.1,6.2 190.6,6.2 193.757,3.043 193.757,2.312 195.869,0.2 v1(197.3,0.2)
NetT_D6_2: T_D6.2 T_IC7.3 | length 1.4
  TopLayer w0.15: T_D6.2@160.136,9.624 160.195,9.683 T_IC7.3@161.5,9.683
NetT_IC1_3: T_IC1.3 T_R4.2 T_R7.2 | length 2.3
  TopLayer w0.2: T_IC1.3@190.698,13.982 190.709,13.993 T_R7.2@192.018,13.993 192,13.976 T_R4.2@192,13.07
NetT_IC6_4: T_IC6.4 T_R25.2 | length 1
  TopLayer w0.2: T_R25.2@47.079,40.119 47.079,41.05 47.129,41.1 T_IC6.4@47.138,41.1
NetT_LD1_2: T_LD1.2 T_R1.1 | length 1.3
  TopLayer w0.2: T_LD1.2@-5.1,45.2 -3.87,45.2 T_R1.1@-3.8,45.27
NetT_LD2_1: T_LD2.1 T_T1.3 | length 204.7
  TopLayer w0.15: v1(-1.5,45.6) -1,45.1 42,45.1 43.143,43.957 49.343,43.957 v1(50.4,42.9)
  TopLayer w0.3: v2(160.177,70.521) 160.213,70.485 T_T1.3@161.335,70.485
  L4 w0.2: v1(50.4,42.9) 59.898,42.9 67.298,35.5 79.935,35.5 91.635,47.2 106.5,47.2 118.98,59.68 118.98,79.033 120.147,80.2 134.1,80.2 143.506,70.794 159.905,70.794 v2(160.177,70.521)
  Bottom Layer w0.15: T_LD2.1@-5.1,45.005 -3.895,45.005 -3.3,45.6 v1(-1.5,45.6)
NetT_LD2_2: T_LD2.2 T_R3.2 | length 1.3
  Bottom Layer w0.2: T_LD2.2@-5.1,43.2 -3.853,43.2 T_R3.2@-3.848,43.195
NetT_LD3_2: T_LD3.2 T_R5.1 | length 1.3
  TopLayer w0.3: T_LD3.2@144.6,87.1 144.7,87.2 T_R5.1@145.85,87.2
NetT_LD4_2: T_LD4.2 T_R6.1 | length 1.1
  TopLayer w0.2: T_R6.1@171.833,6.48 171.833,5.349 T_LD4.2@171.844,5.337
OUT_CH9: IC3.35 J1.4 | length 20.2
  TopLayer w0.15: IC3.35@125.158,66.517 124.317,66.517 122.826,65.026 122.826,61.974 131.778,53.023 J1.4@133.35,53.023
OUT_CH10: IC3.32 J1.5 | length 22.4
  TopLayer w0.15: IC3.32@125.13,68.045 123.146,68.045 121.621,66.52 121.621,59.743 125.6,55.764 125.6,53.4 126.613,52.388 J1.5@128.65,52.388
OUT_CH11: IC3.28 J1.14 | length 33.3
  TopLayer w0.12: v1(131.5,49.8) 131.548,49.848 J1.14@133.35,49.848
  TopLayer w0.15: IC3.28@125.158,70.017 122.2,70.017 120.459,68.276 120.459,57.741 123.754,54.446 123.754,52.446 v1(125.4,50.8)
  Bottom Layer w0.12: v1(125.4,50.8) 126.4,49.8 v1(131.5,49.8)
OUT_CH12: IC3.25 J1.15 | length 32.2
  TopLayer w0.15: v1(121.558,53.754) 119.3,56.012 119.3,69.3 121.5,71.5 IC3.25@125.142,71.5 ; v1(126.244,49.175) 126.282,49.213 J1.15@128.65,49.213
  Bottom Layer w0.15: v1(121.558,53.754) 121.57,53.754 126.148,49.175 v1(126.244,49.175)
OUT_CH13: IC13.35 J1.40 | length 27.8
  TopLayer w0.12: J1.40@133.35,41.593 135.908,41.593 138,39.5 v1(138,28.9) ; v1(138,22.4) 138.038,22.4 139.869,20.569 IC13.35@142.45,20.569
  Bottom Layer w0.12: v1(138,22.4) v1(138,28.9)
OUT_CH14: IC13.32 J1.41 | length 32.5
  TopLayer w0.12: J1.41@128.65,40.958 126.457,40.958 125.331,39.831 125.331,34.769 126.276,33.824 128.376,33.824 129.401,32.799 129.401,30.549 130.65,29.3 132.959,29.3 140.19,22.069 IC13.32@142.45,22.069
OUT_CH15: IC13.28 J1.50 | length 20.4
  TopLayer w0.12: J1.50@133.35,38.418 133.368,38.4 135.6,38.4 136.548,37.452 136.548,28.24 140.718,24.069 141.268,24.069 141.278,24.059 141.676,24.059 141.686,24.069 IC13.28@142.45,24.069
OUT_CH16: IC13.25 J1.51 | length 22.9
  TopLayer w0.127: J1.51@128.65,37.783 130.485,37.783 131.179,37.088 131.179,35.321 v1(132.9,33.6) ; v1(139.2,32.7) 140.319,31.581 140.319,26.419 141.169,25.569 IC13.25@142.45,25.569
  Bottom Layer w0.127: v1(132.9,33.6) 138.3,33.6 v1(139.2,32.7)
P3V3: C2.2 C3.2 C15.2 C16.2 C17.2 C18.2 C19.2 C20.2 C21.2 C22.2 C23.2 C24.2 C25.2 C26.2 C27.2 C54.2 C55.2 C64.2 C65.2 C75.2 C77A.2 C77B.2 C77C.2 C77D.2 C78A.2 C78B.2 C78C.2 C78D.2 C84.2 C85.1 C92.2 C96.2 C97.2 C106.2 C107.2 C108.2 C109.2 C110.2 C111.2 C112.2 C113.2 C114.2 C115.2 C116.2 C117.2 C118.2 IC3.2 IC3.11 IC3.15 IC3.16 IC3.24 IC3.30 IC3.37 IC3.45 IC3.46 IC13.2 IC13.11 IC13.15 IC13.16 IC13.24 IC13.30 IC13.37 IC13.45 IC13.46 IC32.2 IC32.11 IC32.15 IC32.16 IC32.24 IC32.30 IC32.37 IC32.45 IC32.46 IC46.2 IC46.11 IC46.15 IC46.16 IC46.24 IC46.30 IC46.37 IC46.45 IC46.46 IC52A.13 IC52A.16 IC52B.13 IC52B.16 IC52C.13 IC52C.16 IC52D.13 IC52D.16 IC53A.1 IC53B.1 IC53C.1 IC53D.1 J1.1 J1.24 J1.37 J1.60 L9.2 R1.2 R2.2 R3.1 R4.2 R7.2 R8.2 R9.1 R10.2 R11.2 R17.2 R18.2 R19.2 R20.2 R21.2 R22.2 R23.2 R24.2 R25.2 R29A.2 R29B.2 R29C.2 R29D.2 R34A.2 R34B.2 R34C.2 R34D.2 R55.1 R58.2 R59.2 R60.2 R85.1 R89.2 R90.2 R91.2 R92.2 R93.2 R94.2 R95.2 R96.2 R101.2 R221A.2 R221B.2 R221C.2 R221D.2 T_C25.2 T_IC9.1 T_IC9.5 T_R5.2 T_R67.2 T_R68.2 T_R69.2 T_TP2.1 U1.2 U1.3 U1.16 U2.2 U2.3 U2.16 U3.3 U3.16 U4.3 U4.16 | length 239.9
  TopLayer w0.25: v1(50.8,38.5) 50.85,38.45 C78C.2@50.85,37.6 50.845,37.595 IC53C.1@50.845,35.925 ; v1(51.1,69.5) 51.118,69.482 C78B.2@51.118,68.632 51.113,68.627 IC53B.1@51.113,66.957 ; v1(52.1,37.896) 52.195,37.896 52.282,37.809 52.78,37.809 C77C.2@52.926,37.663 ; v1(52.3,68.7) 52.317,68.683 C77B.2@53.2,68.683 ; IC52C.16@52.881,35.938 52.881,37.618 C77C.2@52.926,37.663 ; IC52B.16@53.155,66.958 53.155,68.638 C77B.2@53.2,68.683 ; IC52C.13@56.691,35.938 56.691,37.986 54.742,39.935 53.864,39.935 53.561,39.632 53.561,38.127 53.282,37.848 53.111,37.848 C77C.2@52.926,37.663 ; IC52B.13@56.965,66.958 56.965,69.11 55.999,70.076 54.609,70.076 53.892,69.358 53.892,69.171 53.589,68.868 53.385,68.868 C77B.2@53.2,68.683 ; R21.2@63.676,29.65 63.673,29.653 63.673,31.373 v1(64.8,32.5) ; v1(64.067,61.794) 64.098,61.763 R19.2@64.098,61.031 ; v1(64.385,65.486) 64.385,65.436 64.674,65.148 65.21,65.148 C78A.2@65.24,65.178 65.274,65.144 IC53A.1@66.712,65.144 ; R29C.2@64.982,29.673 v1(64.982,30.482) ; v1(65.593,61.797) 65.601,61.788 R29B.2@65.601,61.009 ; R22.2@66.309,29.696 v1(66.309,30.491) ; v1(66.59,61.818) v1@66.59,61.697 ; R20.2@66.677,61.044 66.59,61.13 v1@66.59,61.697 ; v1@66.677,61.61 v1@66.59,61.697 ; R34C.2@67.768,29.682 v1(67.768,30.445) ; R34B.2@68.1,60.97 v1(68.1,61.655) ; R221C.2@72,29.77 v1(72,30.6) ; R221B.2@73.37,60.3 v1(74.1,60.3) ; IC52A.13@82.685,64.642 82.685,63.155 82.633,63.102 82.633,62.651 83.298,61.986 84.231,61.986 84.445,62.2 85.5,62.2 86.495,63.195 IC52A.16@86.495,64.642 ; IC52A.16@86.65,64.25 IC52A.16@86.65,64.487 ; IC52A.16@86.65,64.27 86.67,64.25 C77A.2@88,64.25 88.022,64.228 88.726,64.228 v1(88.748,64.207) ; v1(88.5,67.3) R34A.2@88.5,68.13 ; v1(89.6,67.3) R18.2@89.6,68.13 ; v1(91,67.3) R29A.2@91,68.13 ; v1(92.3,67.3) R17.2@92.3,68.13 ; v1(94.213,67.117) 94.235,67.139 R221A.2@94.235,67.885 ; v1(96.3,49.2) U3.3@96.3,51.245 ; U3.16@98.845,41.55 98.845,41.881 99.045,42.081 100.513,42.081 C54.2@100.625,42.193 100.81,42.378 100.93,42.378 101.42,42.868 101.42,43.982 v1(101.447,44.009) ; v1(99,28.1) 99.05,28.05 C78D.2@99.05,27.2 99.045,27.195 IC53D.1@99.045,25.525 ; v1(100.4,27.2) 100.483,27.283 C77D.2@101.25,27.283 ; IC52D.16@101.205,25.558 101.25,25.603 C77D.2@101.25,27.283 ; v1(101.264,31.672) 101.356,31.672 102.346,32.661 102.916,32.661 R60.2@103.646,33.391 ; v1(101.4,62.4) 101.448,62.352 101.448,61.039 R59.2@101.508,60.978 ; R101.2@101.661,39.581 101.78,39.461 v1(102.446,39.461) ; v2(101.708,51.208) 102.093,51.593 R58.2@102.093,52.923 ; IC52D.13@105.015,25.558 105.015,27.585 103.679,28.921 102.201,28.921 101.857,28.577 101.857,27.614 101.71,27.468 101.435,27.468 C77D.2@101.25,27.283 ; R23.2@112.051,20.174 112.051,21.194 v1(112.911,22.054) ; v1(113.3,21) 113.305,20.995 R29D.2@113.305,20.192 ; R24.2@114.8,20.17 v1(114.8,21) ; R34D.2@115.9,20.17 v1(115.9,21) ; U1.16@119.745,42.25 119.745,40.256 C75.2@119.746,40.255 119.762,40.239 119.762,39.529 v1(119.777,39.514) ; v1(120.3,21.2) 120.333,21.167 R221D.2@120.333,20.441 ; v1(123.3,68.543) 123.3,68.601 123.84,69.141 124.72,69.141 124.845,69.017 IC3.30@125.158,69.017 ; v1(124.569,73.385) 124.585,73.4 C107.2@125.35,73.4 125.5,73.25 125.5,72.9 125.849,72.551 125.849,72.226 IC3.24@125.858,72.217 ; IC3.37@125.858,65.317 125.858,64.212 C108.2@125.788,64.142 126.506,63.424 v1(126.509,63.424) ; v1(126.6,75.1) 126.635,75.135 127.365,75.135 R10.2@127.4,75.17 ; J1.37@128.65,42.228 128.66,42.237 130.037,42.237 130.4,42.6 v1(130.4,42.609) ; J1.1@128.65,53.658 128.65,54.33 v1(128.653,54.333) ; v1(129.3,74.2) 129.35,74.15 C106.2@129.35,73.4 129.858,72.892 IC3.16@129.858,72.217 ; v1(129.517,63.337) 129.55,63.37 C109.2@129.55,64.1 129.735,64.285 129.735,64.318 129.849,64.431 129.849,65.307 IC3.45@129.858,65.317 ; IC3.46@130.358,65.317 130.358,64.292 C110.2@130.5,64.15 130.519,64.169 130.659,64.169 131.13,63.698 v1(131.222,63.698) ; IC3.15@130.358,72.217 130.358,72.557 130.287,72.628 C92.2@130.287,73.419 130.522,73.654 130.705,73.654 130.821,73.77 v1(130.943,73.77) ; v1(131.6,46.7) 131.628,46.673 J1.24@133.35,46.673 ; IC3.2@132.058,66.517 133.133,66.517 C64.2@133.2,66.45 133.65,66.45 v1(134,66.1) ; IC3.11@132.058,71.017 132.967,71.017 C65.2@133.2,71.25 133.485,71.535 133.835,71.535 v1(133.9,71.6) ; v1(133.3,34.6) 133.35,34.65 J1.60@133.35,35.243 ; v1(140.319,22.819) 140.337,22.819 140.692,23.174 142.031,23.174 142.136,23.069 IC13.30@142.45,23.069 ; v1(140.4,74.8) 140.423,74.823 140.423,84.723 143.875,88.175 T_R5.2@145.734,88.175 ; v1(142.819,17.419) 142.869,17.469 C116.2@142.869,18.219 143.15,18.5 IC13.37@143.15,19.369 ; v1(142.896,28.242) 142.969,28.169 C115.2@142.969,27.419 143.15,27.238 IC13.24@143.15,26.269 ; R11.2@144.281,17.389 144.446,17.554 144.568,17.554 144.576,17.561 144.823,17.561 v1(144.89,17.628) ; v1(145.4,38.4) 145.43,38.43 R94.2@145.43,39.3 145.504,39.374 R93.2@145.504,40.234 ; T_R5.2@145.68,88.36 T_R5.2@145.835,88.205 ; T_R5.2@145.801,88.2 T_TP2.1@148.1,88.2 ; v1(145.9,55.1) R91.2@146.73,55.1 146.77,55.06 R92.2@146.77,54.1 ; v1(146.619,17.419) 146.669,17.469 C117.2@146.669,18.219 147.15,18.7 IC13.45@147.15,19.369 ; v1(146.719,28.219) 146.719,27.488 C114.2@146.741,27.466 147.15,27.057 IC13.16@147.15,26.269 ; IC13.46@147.65,19.369 147.65,19.028 147.581,18.96 C118.2@147.581,18.214 147.816,17.979 148.065,17.979 148.171,17.873 v1(148.293,17.873) ; IC13.15@147.65,26.269 147.65,27.432 C113.2@147.677,27.458 147.884,27.666 148.107,27.666 148.492,28.051 v1(148.492,28.114) ; R96.2@148.264,40.234 148.264,39.306 R95.2@148.27,39.3 148.27,38.43 v1(148.3,38.4) ; IC13.2@149.35,20.569 150.419,20.569 C111.2@150.519,20.469 150.569,20.519 v1(151.219,20.519) ; IC13.11@149.35,25.069 150.419,25.069 C112.2@150.519,25.169 151.269,25.169 v1(151.319,25.219) ; v1(149.4,56) 149.425,55.975 R89.2@149.425,55.152 149.465,55.112 R90.2@149.465,54.152 ; v1(152.1,54) 152.108,53.992 R85.1@152.899,53.992 ; C55.2@153.844,40.218 153.858,40.204 153.858,39.565 v1(153.855,39.562) ; U4.16@153.845,42.25 153.845,40.249 C55.2@153.86,40.234 ; v1(156.593,36.441) 157.434,36.441 157.475,36.4 157.675,36.6 T_IC9.1@157.675,37.77 ; v1(156.8,40.2) T_R69.2@157.705,40.2 157.675,40.17 T_IC9.5@157.675,38.88 ; v1(158.8,37.7) 158.815,37.685 159.46,37.685 T_R67.2@159.475,37.67 159.495,37.65 160.355,37.65 T_R68.2@160.375,37.63 ; R1.2@159.97,72.7 v1(160.8,72.7) ; v1(165.392,39.342) 165.45,39.4 C2.2@165.45,40.3 ; C2.2@165.413,40.3 U2.16@165.413,42.25 U2.16@165.413,42.612 ; R55.1@166.344,54.894 166.508,54.731 166.81,54.731 v1@167.31,54.231
  TopLayer w0.5: U3.3@96.3,51.245 U3.3@96.305,51.25 ; U1.3@117.205,51.95 117.242,51.913 117.242,50.254 117.283,50.213 v1(117.283,50.186) 118.336,50.186 118.475,50.326 U1.2@118.475,51.95 ; v1(151.3,50) 151.305,50.005 U4.3@151.305,51.95 ; U2.3@162.873,51.95 162.873,50.227 163.3,49.8 v1(164.2,49.8) 164.2,51.893 U2.2@164.143,51.95
  Bottom Layer w0.25: v1(95.948,36.561) 96.87,36.561 ; 96.871,36.562 97.155,36.562 97.235,36.643 97.405,36.643 97.414,36.652 97.75,36.652 IC46.30@97.759,36.661 ; v2(97.389,52.888) 97.663,52.615 97.663,52.304 97.765,52.202 97.765,52.085 C20.2@97.942,51.908 ; IC32.30@97.393,56.258 97.398,56.253 97.94,56.253 98.12,56.433 98.12,59.617 98.093,59.645 IC32.37@98.093,59.958 98.093,60.272 98.12,60.3 98.12,60.759 98.106,60.773 98.106,60.982 C21.2@97.921,61.167 97.915,61.174 97.915,61.902 v2(97.908,61.908) ; IC32.24@98.093,53.058 98.093,51.943 98.115,51.92 98.115,51.415 98.445,51.085 98.465,51.085 98.63,50.92 R3.1@98.63,50.9 ; v1(98.096,31.411) C24.2@98.096,32.261 98.096,32.75 98.431,33.085 98.431,33.433 IC46.24@98.459,33.461 ; IC46.37@98.466,40.368 98.466,41.535 C25.2@98.44,41.561 98.675,41.796 98.695,41.796 99,42.1 v1(99,43.1) ; v1@99.07,43.143 R9.1@99.98,43.143 ; v1(101,41.3) 101.063,41.3 101.313,41.55 C26.2@101.9,41.55 101.9,41.401 102.459,40.841 IC46.45@102.459,40.361 ; v1(101.146,32.361) 101.97,32.361 C23.2@102.023,32.309 102.023,32.366 102.491,32.835 102.491,33.43 IC46.16@102.459,33.461 ; v2(101.708,51.208) 101.699,51.218 101.699,51.886 C19.2@101.689,51.896 101.874,52.081 101.874,52.119 102.093,52.338 IC32.16@102.093,53.058 ; C96.2@101.862,61.139 101.894,61.171 101.894,61.826 v2(101.922,61.854) ; C96.2@101.867,61.135 102.052,60.95 102.052,60.844 102.092,60.804 IC32.45@102.093,59.958 ; C26.2@101.95,41.511 C27.2@102.846,41.511 ; IC32.46@102.59,59.961 102.59,60.94 C97.2@102.808,61.158 102.993,61.343 103.118,61.343 103.725,61.95 103.725,62.297 v2(103.744,62.315) ; C18.2@102.593,51.874 IC32.15@102.593,53.058 ; C18.2@102.618,51.767 102.618,51.558 102.641,51.534 103.039,51.534 103.192,51.382 v2(103.286,51.382) ; IC46.15@102.959,33.461 102.959,32.325 C22.2@102.946,32.311 103.131,32.126 103.379,32.126 103.639,31.867 v1(103.7,31.867) ; IC46.46@102.959,40.361 102.959,41.398 C27.2@102.846,41.511 ; v1(103.646,41.89) 103.293,41.538 102.872,41.538 C27.2@102.846,41.511 ; IC32.11@104.293,54.258 104.958,54.258 C17.2@105.508,53.708 ; IC32.2@104.3,58.751 105.401,58.751 C16.2@105.508,58.858 105.693,59.043 105.829,59.043 105.84,59.054 106.253,59.054 106.387,59.188 v1(106.482,59.188) ; IC46.11@104.659,34.661 105.823,34.661 C15.2@105.833,34.671 106.004,34.5 106.391,34.5 106.73,34.161 v1@106.737,34.161 ; IC46.2@104.659,39.161 105.696,39.161 C3.2@105.805,39.27 ; C17.2@105.408,53.708 C17.2@105.508,53.708 ; v1(105.846,40.061) 105.823,40.039 105.823,39.361 105.897,39.287 C3.2@105.897,39.178 ; v1(106.408,53.708) C17.2@105.508,53.708 ; v1(129.4,75) 129.9,74.5 R7.2@129.9,73.17 ; R4.2@133.17,68.2 133.802,68.2 v1(134.152,68.55) ; v1(144.89,17.628) 144.899,17.628 145.636,18.366 145.636,18.636 146.049,19.049 R25.2@146.819,19.049 ; v1(149.7,26.9) 150.134,26.466 150.134,26.074 R8.2@150.189,26.019
  Bottom Layer w0.5: v1(99,43.1) v1@99.027,43.1
  other v1: 106.746,34.161 167.313,54.231 148.2,62.3 145.5,62.4 146.9,62.4 146.3,63.4 147.5,63.4 148.8,63.4